# Altium PCB AVP32F2812_EVM_V1.0.PcbDoc (part 2 of 3)
Units mil, origin at the board's own origin, x right, y up, seen from the top; angles counter-clockwise.
Board outline 5669.29 x 3897.64 mil, 2 copper layers (Top Layer, Bottom Layer); 154 components, 189 nets, 732 pads, 469 vias.
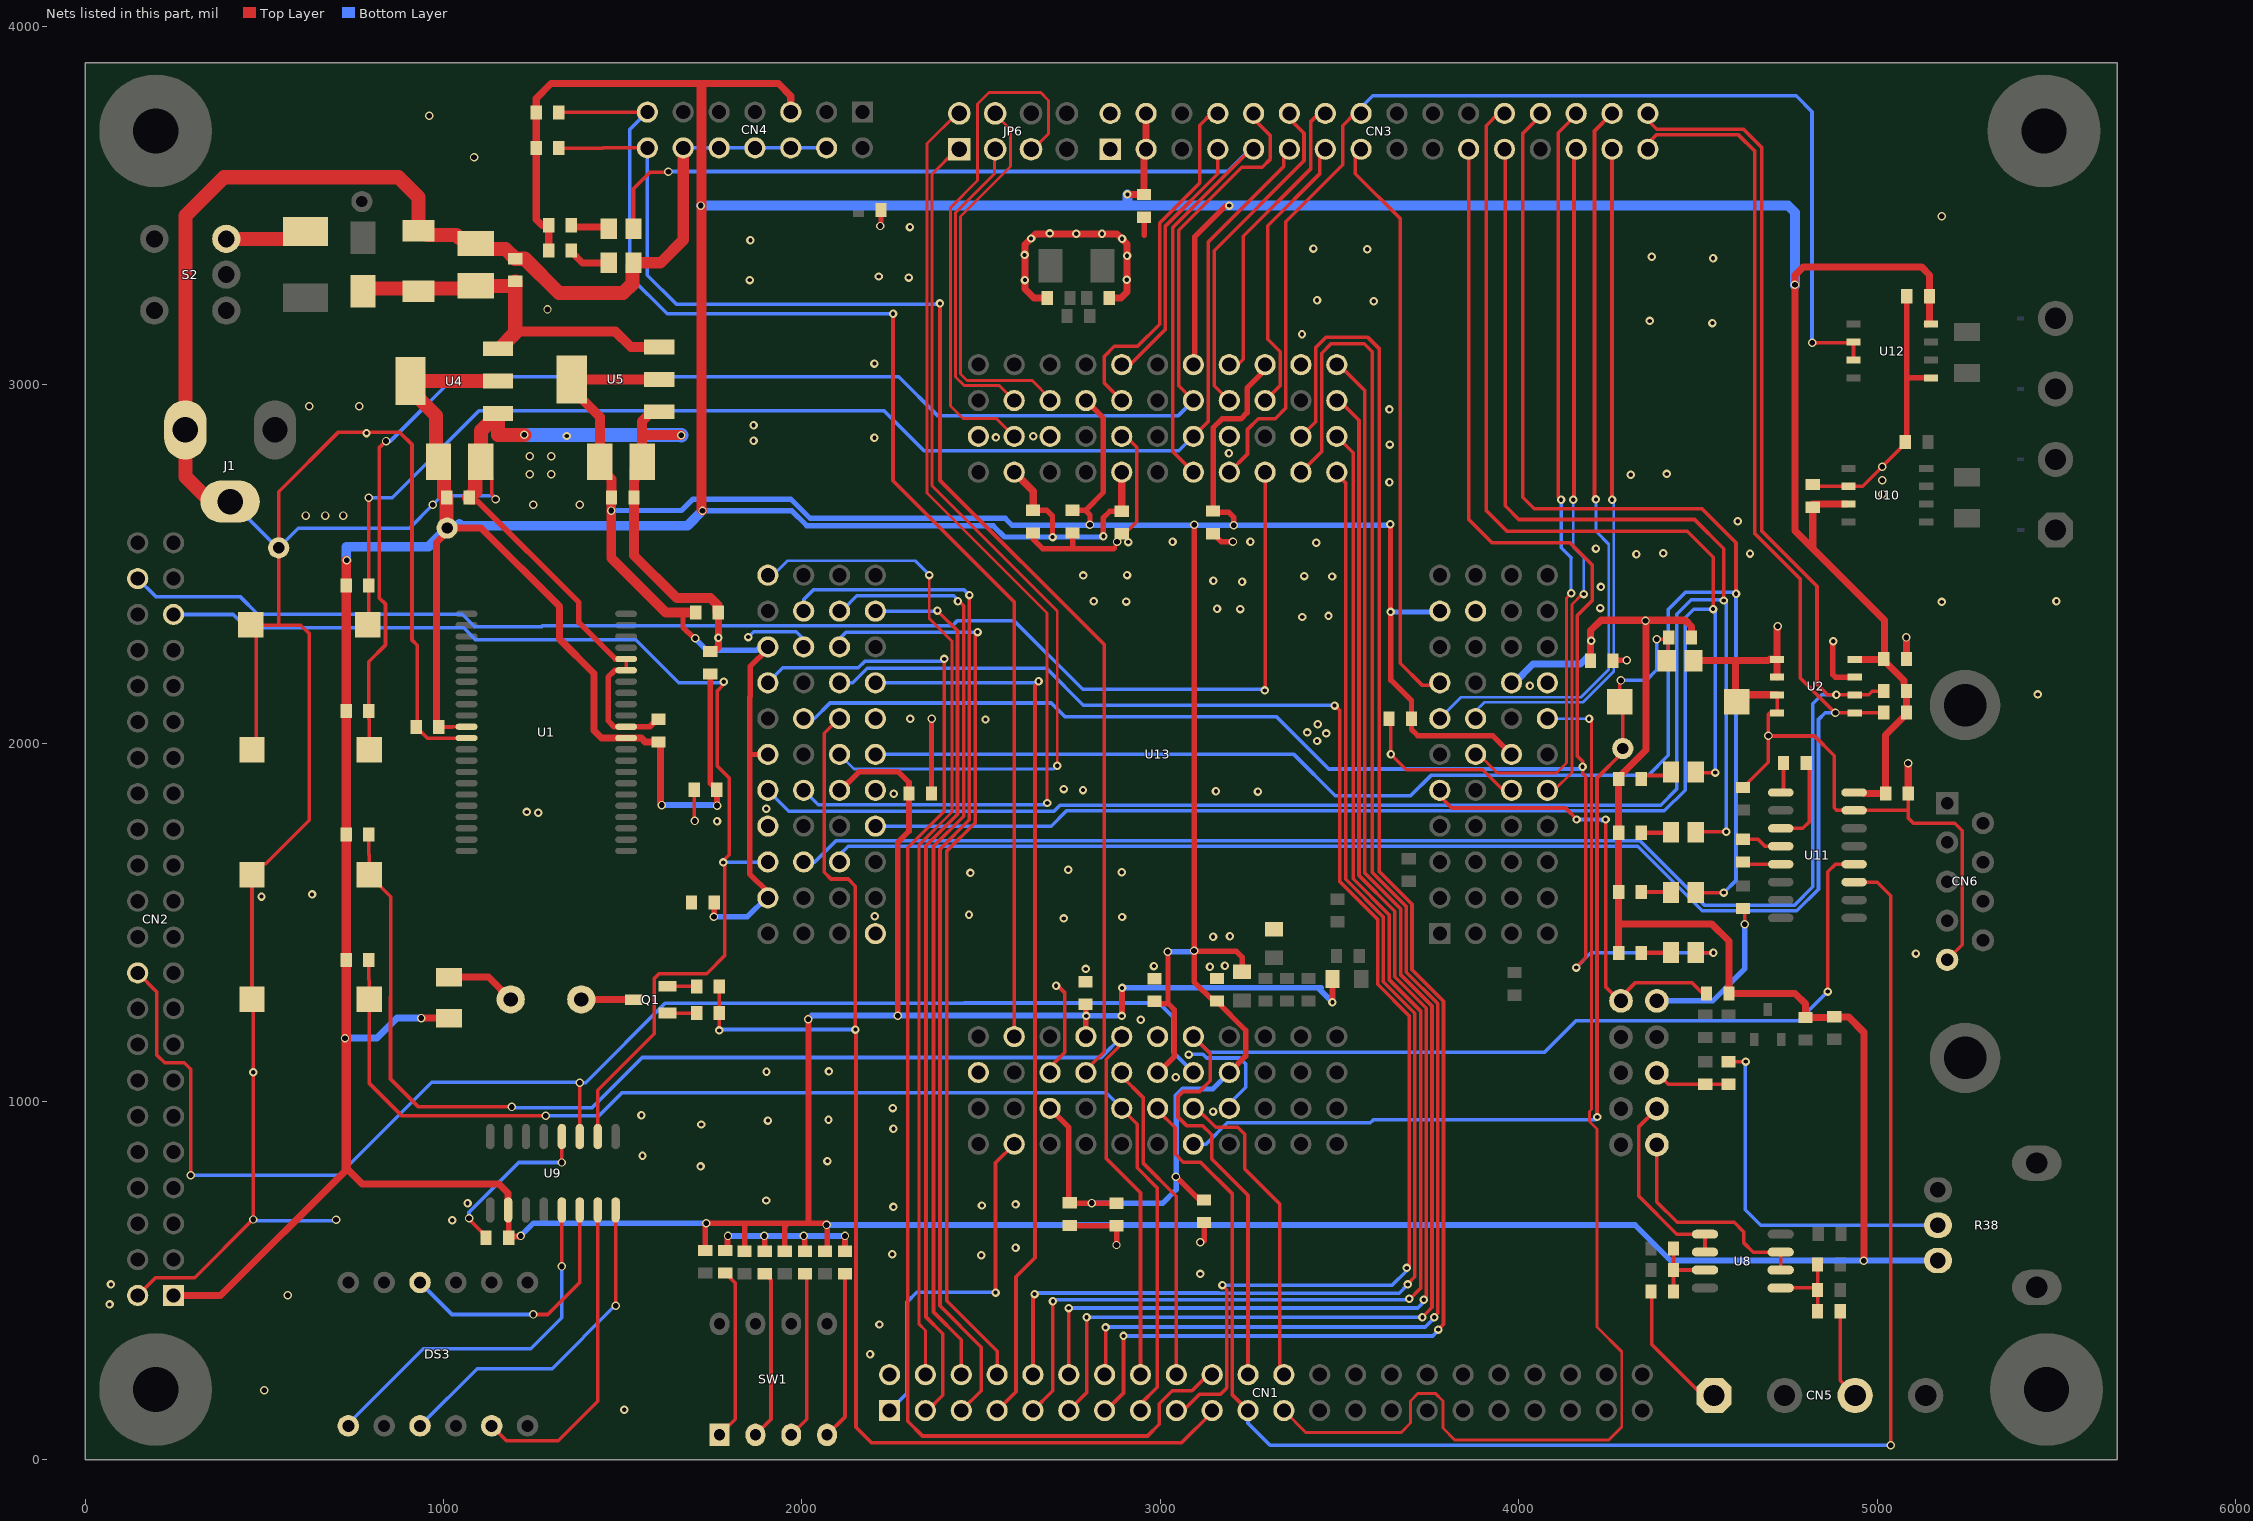
[diagram p2: the nets of this part, all layers, seen from the top]

## Via types
v1: diameter 23.62, hole 11.81, Top Layer to Bottom Layer, tented both sides, 308 vias
v2: diameter 23.62, hole 15.75, Top Layer to Bottom Layer, 161 vias

## Nets (pads, with @x,y where several pads share a name; then routed paths per layer and width w, separated by ;. In a path a pad name is that pad's centre, name@x,y a point inside that pad or via, vN(x,y) a via of type N, cw(c..) or ccw(c..) an arc to the next point about the centre after c; other vN are vias at no path point) (continued)
DGND: C1.2 C2.2 C3.2 C4.2 C5.1 C6.2 C7.2 C8.2 C9.2 C10.2 C11.2 C12.2 C13.2 C14.2 C15.2 C16.2 C17.2 C18.2 C19.2 C20.2 C21.2 C22.2 C23.2 C24.2 C25.2 C26.2 C31.2 C32.2 C33.2 C34.2 C47.2 C49.2 C50.2 C51.2 C52.2 C55.2 CN1.2 CN2.2 CN3.1 CN3.2 CN4.4 CN4.6 CN4.8 CN4.10 CN4.12 CN6.5 D2.1 DS2.2 J1.2 J1.3 JP5.2 K1.2 K2.2 K3.2 K4.2 L5.1 Q1.S R3.1 R5.1 R7.1 R9.1 R12.1 R28.2 R40.1 S1.2 TP6.1 U1.12 U1.34 U1.39 U1.40 U2.1 U2.2 U2.3 U2.4 U2.7 U4.1 U5.1 U9.4 U10.2 U11.15 U12.5 U13.19 U13.32 U13.38 U13.52 U13.58 U13.70 U13.78 U13.86 U13.99 U13.105 U13.113 U13.120 U13.129 U13.134 U13.142 U13.153 U13.163 | length 19772.3
  Top Layer w10: CN2.2@146.61,459.05 196.39,508.83 305.83,508.83 468,671 v2(469,671) v1(469,1082) 469,1281.41 K4.2@465.41,1285 K3.2@465.41,1633.12 495.84,1663.55 503.55,1663.55 625.26,1785.26 625.26,2306.02 601.92,2329.35 537,2329.35 ; K2.2@465.41,1981.24 477.76,1993.59 477.76,2313.86 465.41,2326.21 465.41,2329.35 537,2329.35 ; D2.1@930,3429.25 D2.1@930,3440 ; U1.12@1064.08,2014.25 954.25,2014.25 C1.2@923.5,2045 927,2048.5 927,2273 912,2288 912,2833 878.07,2866.93 705.54,2866.93 540,2701.38 TP6.1@540,2545 540,2332.36 537,2329.35 ; v2@1072.44,670 1118.5,623.94 C47.2@1118.5,620 ; C8.2@1088.31,2769.25 1104.05,2769.25 1134.49,2738.82 1134.49,2694.2 1145,2683.69 v2(1145,2680) ; v2@1330,835 U9.4@1330,902.36 ; U1.34@1509.4,2045.75 U1.34@1518.24,2045.75 ; U1.39@1509.4,2203.23 U1.40@1509.4,2234.72 ; Q1.S@1625.08,1321.57 R28.2@1706.42,1321.57 ; C11.2@1699.5,1870 1699.5,1784.5 v2(1701,1783) ; C11.2@1701.25,1868.25 C11.2@1702.99,1869.99 ; C11.2@1703.5,1870 1703.5,1871.22 C11.2@1705,1872.72 ; U13.99@2004.73,2268.5 U13.99@2011.5,2268.5 ; U13.142@2692.13,1081.1 2692.13,1096.13 2732.65,1136.65 2732.65,1304.35 v1@2710,1327 ; 2874,2542 2874,2558 2934,2618 2934,2826 2904.1,2855.9 U13.70@2892.13,2855.9 ; U13.163@3192.13,981.1 U13.163@3208.9,981.1 ; C21.2@3637.5,2068 3643,2062.51 v1(3643,1969) 3686,1926 3899,1926 3956.5,1868.5 U13.19@3979.53,1868.5 ; C52.2@4625,1538.5 4630,1533.51 v2(4630,1495) ; C51.2@4625,1876.5 4628.94,1876.5 4639.69,1887.24 4639.69,1891.18 4695.65,1947.14 v2@4695.65,2020 ; U2.3@4720.65,2135 4720.65,2085 4700.65,2085 4695.65,2080 v2@4695.65,2020 ; C55.2@4820,2721.5 4824.69,2716.8 4959.24,2716.8 5078.5,2836.06 R40.1@5078.5,2840 ; C34.2@5086.5,1860 5086.5,1811.05 ; CN6.5@5195,1395.42 5237.44,1437.87 5237.44,1755.83 5216.44,1776.83 5100.94,1776.83 5086.5,1791.27 5086.5,1811.05 ; v2@4695.65,2020 4825,2020 4880,1965 4880,1820 4887.72,1812.28 U11.15@4935.51,1812.28 5085.26,1812.28 5086.5,1811.05
  Top Layer w15: v2@2220.5,3441.5 R12.1@2220.5,3487 ; C14.2@2361.5,1860 v2@2361.5,2068 ; C15.2@2645,2586.5 2645,2569 2672,2542 2762,2542 ; C24.2@2747,654.5 2748,653.5 C32.2@2878,653.5 v2@2878,598 ; C22.2@2755,2586.5 2755,2549 2762,2542 ; 2870.44,2542 2762,2542 ; C3.2@2944,3468 2955,3457 2955,3417 ; v2@3122,612 C19.2@3122,662.5 ; C31.2@3147,2584.5 3169.51,2562 v2@3206,2562 ; C13.2@4262.81,2230 4263.81,2231 v2(4301,2231) ; v1@4876,2286 4876,2191 4883,2184 U2.7@4937.27,2184 ; R40.1@5078.5,2840 5082.5,2844 5082.5,3013 ; C49.2@5082.5,3247 5082.5,3013 ; U12.5@5150.27,3019 5088.5,3019 5082.5,3013
  Top Layer w15.75: C7.2@1071.5,2685 1071.5,2681.06 1079.37,2673.19 1096.81,2673.19 1377.5,2392.5 1377.5,2336.5 1479.28,2234.72 U1.40@1509.4,2234.72 ; U1.34@1509.4,2045.75 1476,2045.75 1459,2062.75 1459,2184.14 1478.1,2203.23 U1.39@1509.4,2203.23 ; U1.34@1518.24,2045.75 1575.32,2045.75 1596.06,2066.5 C2.2@1600,2066.5 ; R3.1@1786,584.5 1792.06,590.55 1792.06,619.93 v2@1793.56,621.44 ; v2(1895,625) 1896,624 R5.1@1896,582.5 ; v2(2005,625) 2008,622 R7.1@2008,582.5 ; R9.1@2120,582.5 v2(2120,625)
  Top Layer w19.68: C16.2@1753.94,2256.5 1766.5,2269.05 C20.2@1766.5,2365 ; C5.1@2684.5,3242 2647,3242 2622,3267 v1(2622,3292) 2622,3391 v1(2639,3408) 2652,3421 v1(2765,3421) v1(2837,3421) 2879,3421 v1(2893,3407) 2907,3393 v1(2907,3360) 2907,3259 2890,3242 C4.2@2857.5,3242 ; C6.2@4487.4,2230 4605,2230 ; U2.3@4720.65,2135 4628.38,2135 S1.2@4608.38,2115 4605,2118.39 4605,2230 ; U2.2@4720.65,2185 U2.1@4720.65,2235 ; v2@4722,2318 v2(4722,2326) 4720.65,2324.65 U2.1@4720.65,2235 ; 4605,2230 4695.65,2230 4700.65,2235 U2.1@4720.65,2235
  Top Layer w20: C50.2@5081.5,2235 v2@5081.5,2295.5 ; C34.2@5086.5,1860 v2@5086.5,1944.5
  Top Layer w27.56: U5.1@1602.05,2924.45 1580.39,2924.45 1554.05,2898.11 1554.05,2860 ; v2(1663,2859) 1662,2860 1554.05,2860 ; C20.2@1764.53,2366.97 1764.53,2385.47 1745,2405 1650.46,2405 1531.5,2523.96 C25.2@1531.5,2685 1531.5,2731.46 1532.4,2732.36 1532.4,2763.35 C26.2@1554.05,2785 1554.05,2860
  Top Layer w31.5: DS2.2@1530,3340 1605,3340 1668.66,3403.66 CN4.12@1668.66,3660.79
  Top Layer w39.37: J1.2@404.58,2674.02 348.98,2674.02 279.58,2743.42 J1.3@279.58,2874.02 279.58,3471.58 387,3579 874,3579 930,3523 D2.1@930,3440 ; D2.1@955.59,3418.23 1035.44,3418.23 1043.87,3409.8 1074.25,3409.8 C9.2@1090,3394.05 1105.75,3378.31 1173.19,3378.31 C10.2@1200,3351.5 1226.5,3351.5 1322,3256 1501,3256 1526.85,3281.85 1526.85,3330.75 1530,3333.9 DS2.2@1530,3340 ; C7.2@1071.5,2685 1088.31,2701.81 1088.31,2769.25 C8.2@1104.05,2785 1104.05,2871.46 U4.1@1152.05,2919.45 1152.05,2860 v2(1225,2860)
  Bottom Layer w10: J1.2@404.58,2674.02 407.44,2674.02 536.46,2545 TP6.1@540,2545 595,2600 905,2600 v2(970,2665) 995,2690 v2@1140,2690 ; v2(469,671) 472,668 698,668 v2(700,670) ; v2(1071,674) 1071,691 1210,830 v2(1330,830) ; CN4.12@1668.66,3660.79 CN4.10@1768.66,3660.79 CN4.8@1868.66,3660.79 CN4.6@1968.66,3660.79 CN4.4@2068.66,3660.79 ; v1(1850,2296) 1865,2311 1984,2311 2004.73,2290.27 U13.99@2004.73,2268.5 ; v1@3090,1132 3118.6,1132 3128.97,1121.63 3221.37,1121.63 3238,1105 3238,1040 3192.13,994.13 U13.163@3192.13,981.1
  Bottom Layer w15: JP5.2@4385,1281 4541,1281 4630,1370 v2(4630,1495)
  Bottom Layer w15.75: v2(1793.56,625) v2(1895,625) v2(2005,625) v2(2120,625)
  Bottom Layer w39.37: v2(1225,2860) 1662,2860 v2(1663,2859)
  other v1: 1504,140 2190,295 2216,378 68,434 72,490 3111,519 2500,571 2252,574 2596,592 1024,669 2255,706 2502,710 2596,713 1067,716 1900,724 1717,819 2071,834 1555,849 2255,924 1719,936 1905,947 2074,949 1552,962 3147,972 2253,982 3043,1068 1901,1083 2075,1084 3079,1131 2945,1228 2709,1323 2792,1370 3138,1376 2982,1378 3180,1379 5108,1413 3147,1460 3194,1461 2730,1511 2893,1515 2203,1517 2466,1521 492,1572 633,1578 2470,1638 2892,1640 2743,1647 1763,1782 1264,1806 1232,1808 1900,1817 2256,1859 3272,1865 3155,1866 2784,1869 2730,1872 3437,2006 3463,2027 3410,2030 3439,2053 2512,2066 2302,2068 5448,2136 4031,2160 4877,2284 1767,2294 3396,2352 3469,2355 3223,2374 3158,2375 4227,2377 5180,2394 2905,2395 2814,2396 5500,2396 4229,2436 3228,2450 3148,2453 3479,2465 3401,2466 2785,2468 2907,2469 4328,2527 4645,2529 4403,2530 4215,2543 3435,2559 2910,2561 3034,2562 3251,2562 4611,2619 3639,2728 4312,2749 4413,2751 3191,2809 3640,2833 1865,2844 2202,2852 2541,2853 2645,2856 1344,2857 785,2865 1865,2887 3639,2931 2202,3059 3395,3141 4540,3172 4365,3178 3595,3233 3437,3236 1854,3292 2906,3293 2298,3299 2214,3302 4542,3353 4371,3357 2621,3362 3577,3378 3427,3380 1856,3403 2691,3422 2301,3440
  other v2: 500,195 565,460 2877.44,599.83 3111,608 5085.94,1943.83 4696.44,2020.83 2362,2068 5080.94,2294.83 2879,2562 3202.44,2561.83 615,2635 670,2635 720,2635 1250,2665 1380,2665 5013.48,2695 5013.48,2733.02 1240,2750 1300,2750 5013.48,2771.04 1240,2800 1300,2800 625,2940 765,2940 1290,3210 2218.44,3442.83 5180,3470 1085,3635 960,3750
DP: DS3.dp U9.16 | length 952
  Top Layer w10: v2(1480,430) U9.16@1480,697.64
  Bottom Layer w10: DS3.dp@934.25,95.27 1093.98,255 1303,255 1478,430 v2(1480,430)
DSP_R\S\T\: C6.1 R15.2 S1.1 TP3.1 U13.160 | length 2699.2
  Top Layer w10: v1(4219,957) 4215,957 4218,960 4218,1903 4290,1975 TP3.1@4290,1985 4290,2106.61 S1.1@4281.61,2115 v2@4281.61,2166.87 ; v2@4390,2290 R15.2@4413.5,2290 ; C6.1@4412.6,2230 4417,2234.4 4417,2286.5 R15.2@4413.5,2290 ; R15.2@4418.5,2295 R15.2@4413.5,2290
  Bottom Layer w10: U13.160@3092.13,881.1 3127.1,881.1 3186.58,940.58 3585.58,940.58 3593.81,948.81 4212.81,948.81 4219,955 v1(4219,957) ; v2(4285,2175) 4355,2175 4385,2205 v2(4385,2290)
DVDD1V8: C17.1 C18.1 C19.1 C20.1 C21.1 C22.1 C23.1 C24.1 C25.1 C26.1 C31.1 C32.1 L4.1 U5.2 U13.23 U13.37 U13.56 U13.75 U13.100 U13.112 U13.128 U13.143 U13.154 U13.162 | length 10201.5
  Top Layer w15: 1668,2365 1668,2323 1698.17,2292.83 v2(1702.44,2292.83) ; v2@1755,1516 C17.1@1755,1555 ; U13.128@1904.73,1568.5 1904.73,1584.27 1854,1635 1854,1966 ; U13.112@1904.73,1968.5 1856.5,1968.5 1854,1966 ; U13.100@1904.73,2268.5 1904.73,2262.73 1855.31,2213.31 1855.31,2130.15 1854,2128.84 1854,1966 ; U13.143@2692.13,981.1 2744,929.23 2744,720.5 C24.1@2747,717.5 2747.67,716.83 v2(2808.44,716.83) 2877.67,716.83 C32.1@2878,716.5 ; C22.1@2755,2649.5 2790.5,2649.5 ; U13.75@2792.13,2955.9 2841,2907.03 2841,2700 2790.5,2649.5 ; v2(2803.44,2609.83) 2803.44,2636.55 2790.5,2649.5 ; U13.154@2992.13,1081.1 2989,1084.23 2997.23,1084.23 3039,1126 3039,1256 3022,1273 3019,1273 ; C23.1@2995.5,1279.5 C23.1@2984,1279.5 2990.5,1273 3019,1273 ; v2@3021,1417.83 3021,1275 3019,1273 ; v2@3045,790 3109.5,725.5 C19.1@3122,725.5 ; v2(3094.44,2609.83) v2@3094.44,1419 ; C31.1@3144.95,2643.84 C31.1@3147,2643.84 ; C31.1@3147,2643 C31.1@3147,2643.84 ; U13.162@3192.13,1081.1 3238,1126.98 3238,1199 3158,1279 C18.1@3158,1280.5 3147.5,1280.5 3094,1334 3094,1419 v2@3094.44,1419 ; v2(3205,2608) 3205,2630 3191.16,2643.84 C31.1@3147,2643.84 ; L4.1@3228,1362 3228,1403 3212,1419 v2@3094.44,1419 ; U13.56@3292.13,3055.9 3292.13,3041.13 3242,2991 3242,2922 3225,2905 3172,2905 3147,2880 C31.1@3147,2643.84 ; v1(3641,2611) 3642,2610 v1(3642,2366) 3646,2366 3643,2363 3643,2176 3700.5,2118.5 C21.1@3700.5,2068 3700.5,2038.5 3718,2021 3927.03,2021 U13.23@3979.53,1968.5 ; U13.37@3779.53,2368.5 U13.37@3786.5,2368.5
  Top Layer w27.56: U5.2@1357.95,3015 1357.95,2988.05 1435.94,2910.06 C26.1@1435.94,2785 1435.94,2769.25 1468.5,2736.69 C25.1@1468.5,2685 1470,2683.51 1468,2681.51 v2(1468,2649) 1468,2517 1620,2365 1668,2365 C20.1@1703.5,2365 ; U5.2@1367.95,3015 U5.2@1602.05,3015
  Bottom Layer w15: v2(1468,2649) 1664,2649 1696,2681 1968.7,2681 2022.2,2627.5 2567,2627.5 2586.5,2608 v2@3199,2608 ; v2@1702,2292 1735,2259 1872.72,2259 1882.22,2268.5 U13.100@1904.73,2268.5 ; v2(1754.44,1515.83) 1847.66,1515.83 1900.34,1568.5 U13.128@1904.73,1568.5 ; U13.143@2692.13,981.1 U13.143@2701.9,981.1 ; v2@2809,715 2810,716 3006,716 3044,754 3044,1016.1 3062.9,1035 3146.02,1035 U13.162@3192.13,1081.1 ; U13.154@2992.13,1072.87 U13.154@2992.13,1081.1 ; v2(3020.44,1417.83) 3090.89,1417.83 v2(3093.89,1420.83) ; v2(3205,2608) 3642.17,2608 v1@3643,2608.83 ; v1(3642,2366) 3777.02,2366 U13.37@3779.53,2368.5
  other v2: 3043.44,789.83
DVDD3V3: C1.1 C2.1 C3.1 C7.1 C8.1 C11.1 C12.1 C13.1 C14.1 C15.1 C16.1 C33.1 C34.1 C41.2 C47.1 C49.1 C50.1 C55.1 CN2.1 CN3.3 CN3.4 CN4.5 L3.1 R1.2 R2.2 R4.2 R6.2 R8.2 R10.2 R13.1 R14.1 R15.1 R16.1 R17.1 R21.2 R22.1 R23.1 R24.2 R25.2 R27.2 R29.1 R32.1 R35.1 R37.1 R38.3 R50.1 TP4.1 U1.11 U1.33 U2.8 U4.2 U9.10 U10.3 U11.16 U12.8 U13.31 U13.64 U13.69 U13.81 U13.114 U13.145 | length 28763.1
  Top Layer w10: C1.1@986.5,2045 1024.44,2045 1025.19,2045.75 U1.11@1064.08,2045.75 ; R15.1@4475,2301.5 R15.1@4481.5,2295
  Top Layer w15: C15.1@2645,2649.5 2683.5,2649.5 2699,2634 v1(2699,2575) ; U13.145@2792.13,1181.1 C12.1@2792.13,1267.38 ; v1(2841,2577) 2841,2629 2859,2647 C33.1@2892,2647 ; U13.64@3092.13,3055.9 3096,3059.78 3096,3413 3183,3500 v1(3192,3500)
  Top Layer w15.75: U9.10@1180,697.64 1181.5,696.14 C47.1@1181.5,620 1184.99,623.49 1213.49,623.49 v2(1215,625) ; R4.2@1730,584.5 1730,658 v2(1733,661) 1961,661 ; C16.1@1744,2193.01 1744,1888.5 C11.1@1762.5,1870 ; C16.1@1750,2193.5 C16.1@1753.94,2193.5 ; v2(1763,1826) 1763,1862.5 1761,1864.5 1766.5,1870 C11.1@1764.5,1872 ; R6.2@1840,582.5 1840,658 ; R8.2@1952,582.5 1952,652 1961,661 ; v2@2018,1235 2018,661 ; 2070,600 2070,661 2018,661 ; U13.114@2104.73,1868.5 2107.5,1868.5 2159,1920 2269,1920 2298.5,1890.5 C14.1@2298.5,1860 2298.5,1754.5 2267,1723 v2(2267,1239) v2@2267,1236 ; v1(2892,1239) 2893,1240 v1(2893,1317) ; v1(3480,1277) L3.1@3480,1342 ; 4770,2922 4773,2919 ; 1961,661 2018,661
  Top Layer w19.68: CN2.1@246.61,459.05 378.06,459.05 728.5,809.5 ; 728.5,814.5 773.01,770 ; v2(938,1233) 938,1231.93 938.98,1232.91 R23.1@1015,1232.91 ; C1.1@986.5,2045 980.59,2050.91 980.59,2065.78 980,2066.37 980,2559.35 1010,2589.35 TP4.1@1010,2600 1104.89,2600 1324,2380.89 1324,2290 1420,2194 1420,2035 1440.75,2014.25 U1.33@1509.4,2014.25 1552,2014.25 1562.75,2003.5 C2.1@1600,2003.5 1605,1998.5 1605,1832.08 1608.73,1828.35 v2(1608.73,1827.28) ; R17.1@1293.5,3375 R16.1@1293.5,3445 1275,3445 1258.5,3461.5 R14.1@1258.5,3660 R13.1@1258.5,3760 1258.5,3798.5 1300,3840 1934,3840 1968.66,3805.34 CN4.5@1968.66,3760.79 ; v1(2908,3531) 2908.5,3530.5 C3.1@2954,3530.5 ; C3.1@2944,3530.99 2954,3540.99 2954,3651 CN3.3@2960,3657 2960,3740 CN3.4@2961,3741 ; U13.31@3979.53,2168.5 U13.31@3979.53,2177.53 ; C13.1@4199.82,2230 v1@4199.82,2284 ; v1@4200,2286.38 4200,2314 4228.83,2342.83 v2@4350,2342.83 ; R27.2@4278.5,1415 4278.5,1496 ; R15.1@4481.5,2295 4481.5,2325.5 4464.17,2342.83 v2@4350,2342.83 ; v2@4770,3280 4770,2922 4770,2593 4820,2543 ; v2(4770.44,3278.83) 4770.44,3305.44 4794,3329 5123,3329 5145.5,3306.5 C49.1@5145.5,3247 5145.5,3176.77 5138.5,3169.77 U12.8@5139.27,3169 ; U10.3@4915.98,2666.8 4820,2666.8 4820,2543 ; U11.16@4935.51,1862.28 4960.2,1862.28 4962.48,1860 C34.1@5023.5,1860 5023.5,2023.07 5081.5,2081.06 R2.2@5081.5,2085 R1.2@5081.5,2145 ; U2.8@4937.27,2234 5017.5,2234 C50.1@5018.5,2235 ; v2(4962.44,555.83) 4962.44,1193.56 4919.5,1236.5 C41.2@4880,1236.5 4878,1234.5 R22.1@4800,1234.5 4800,1273 4771,1302 4586,1302 4586,1448 4538,1496 4278.5,1496 ; 5075,2165 5075,2174.57 5018.5,2231.06 C50.1@5018.5,2235 ; 4278.5,1496 R25.2@4278.5,1585 R24.2@4278.5,1750 4278.5,1903.94 4355,1980.43 4355,2337.83 v2@4350,2342.83 ; 4820,2543 5020,2343 5020,2236.5 C50.1@5018.5,2235
  Top Layer w20: 773.01,770 1155,770 1180,745 U9.10@1180,697.64 ; U13.81@2592.13,2755.9 2645,2703.03 C15.1@2645,2649.5 ; C33.1@2892,2647 2892,2755.78 U13.69@2892.13,2755.9
  Top Layer w27.56: 728.5,814.5 R37.1@728.5,1395 R35.1@728.5,1745 R32.1@728.5,2090 R29.1@728.5,2440 v2@728.5,2510 ; 1719.35,3834.65 1719.35,2651.92 v2(1722.44,2648.83) ; CN3.4@2944,3758 CN3.4@2961,3741
  Top Layer w39.37: TP4.1@1010,2600 1008.5,2601.5 C7.1@1008.5,2685 1001.69,2691.81 1001.69,2769.25 C8.1@985.94,2785 978.7,2792.25 978.7,2914.65 907.95,2985.39 U4.2@907.95,3010 U4.2@1152.05,3010
  Bottom Layer w15: v2(1722.44,2648.83) 1971.17,2648.83 2013.5,2606.5 2533.5,2606.5 2565,2575 v1(2699,2575) v1@2842,2575
  Bottom Layer w15.75: v2(1215,625) 1251,661 v2(1733,661) ; v2(1608.73,1827.28) 1761.72,1827.28 v2(1763,1826) ; v2(2017.44,1229.83) 2027.62,1240 v1@2795,1240 ; v2(2068.44,655.83) 4324.17,655.83 4423.43,556.57 R38.3@5169.41,556.57 ; v1(2793,1239) v1(2892,1239) ; v1@2897,1318 3439,1318 ; 3449,1318 3439,1318 ; v1(3480,1277) 3439,1318
  Bottom Layer w19.68: v2(725,1176.77) 725.75,1177.53 814.53,1177.53 870,1233 v2(938,1233) ; U13.31@3979.53,2168.5 3987.5,2168.5 4040,2221 4172,2221 4200,2249 v1@4200,2286
  Bottom Layer w27.56: v2(730,2510) 728.5,2511.5 728.5,2547.83 957.83,2547.83 TP4.1@1010,2600 1016.03,2606.03 1038.86,2606.03 1043.92,2611.08 1048.46,2606.54 1680.15,2606.54 v2(1722.44,2648.83) ; v2(1718,3500) 2909,3500 ; v1(2908,3531) 2908,3501 2909,3500 ; v2@4770,3276 4770,3481 4751,3500 v1(3192,3500) 2909,3500
  other v1: 4202,2286
  other v2: 4353.44,2341.83
E: DS3.e U9.13 | length 1024.9
  Top Layer w10: v2(1330,540) U9.13@1330,697.64
  Bottom Layer w10: DS3.e@734.25,95.27 737.1,98.12 737.1,104.1 943,310 1243,310 1330,397 v2(1330,540)
EMU0: CN4.13 R13.2 U13.137 | length 3663.1
  Top Layer w10: R13.2@1321.5,3760 1444.44,3760 1445.23,3760.79 CN4.13@1568.66,3760.79 ; v1(2254,3197.72) 2254,2732 2592.13,2393.87 U13.137@2592.13,1181.1
  Bottom Layer w10: CN4.13@1568.66,3760.79 1519,3711.13 1519,3303 1624.28,3197.72 v1(2254,3197.72) v1@2256,3197.72
EMU1: CN4.14 R14.2 U13.146 | length 3812
  Top Layer w10: R14.2@1321.5,3660 1444.44,3660 1445.23,3660.79 CN4.14@1568.66,3660.79 ; v1(2385,3227) 2385,2733 2843,2275 2843,1138.63 2792.13,1087.75 U13.146@2792.13,1081.1
  Bottom Layer w10: CN4.14@1568.66,3660.79 1568.66,3305.34 1649,3225 2375,3225 v1@2384,3234
EPWM1A: CN1.4 U13.92 | length 2787.7
  Top Layer w8: CN1.4@2344.44,238 2344.44,361.56 2326,380 2326,1715 2418.81,1807.81 2418.81,2284.19 2355,2348 v1(2355,2469) v1@2355,2470
  Bottom Layer w8: U13.92@1904.73,2468.5 1919.5,2468.5 1960,2509 2316,2509 v1@2355,2470
EPWM1B: CN1.3 U13.93 | length 2514.2
  Top Layer w10: CN1.3@2344.44,138 2350,138 2393,181 2393,352 2346,399 2346,1713.79 2433.81,1801.6 2433.81,2313.19 2383,2364 2380,2364 v1@2384,2368
  Bottom Layer w10: U13.93@2204.73,2368.5 v1@2384,2368.5
  other v1: 2378,2370
EPWM2A: CN1.6 U13.94 | length 2591.6
  Top Layer w10: v1@2437,2397 2451,2383 2451,1796.16 2367,1712.16 2367,413 2444.44,335.56 CN1.6@2444.44,238
  Bottom Layer w10: U13.94@2104.73,2368.5 2110.5,2368.5 2153,2411 2423,2411 v1@2440,2394
  other v1: 2435,2396
EPWM2B: CN1.5 U13.95 | length 2891.7
  Top Layer w10: CN1.5@2444.44,138 2500,193.56 2500,315 2385,430 2385,1704 2467,1786 v1(2467,2413)
  Bottom Layer w10: U13.95@2004.73,2368.5 2004.73,2400.73 2032,2428 2087.92,2428 ; 2087.94,2427.98 2121.51,2427.98 ; 2121.54,2428 2187.92,2428 ; 2187.94,2427.98 2221.51,2427.98 ; 2221.54,2428 2452,2428 v1(2467,2413)
EPWM3A: CN1.8 U13.98 | length 2582.3
  Top Layer w10: v1@2490,2309 v1(2490,2310) 2483,2303 2483,1778 2404,1699 2404,444 2544.44,303.56 CN1.8@2544.44,238
  Bottom Layer w10: U13.98@2104.73,2268.5 2104.73,2290.73 2123.03,2309.03 2489.03,2309.03 v1(2490,2310)
EPWM3B: CN1.7 U13.101 | length 2539.1
  Top Layer w10: CN1.7@2544.44,138 2597,190.56 2597,511 2650,564 2650,2160 2660,2170 v1(2660,2173)
  Bottom Layer w10: U13.101@2204.73,2168.5 v1@2661,2168.5
EPWM4A: CN1.10 U13.45 | length 3632.1
  Top Layer w10: CN1.10@2644.44,238 v1@2644.44,455 ; U13.45@3492.13,2755.9 3492.13,2750.87 3517.13,2725.87 3517.13,1619.87 3622,1515 3622,1334 3709.81,1246.19 3709.81,510.81 3690,491 v1(3690,490)
  Bottom Layer w10: v1(2649,463) 2651.81,465.81 3162.93,465.81 3163.55,465.19 3666.19,465.19 v1@3689,488
EPWM4B: CN1.9 U13.46 | length 3849.4
  Top Layer w10: CN1.9@2644.44,138 2700,193.56 v1(2700,443) v1@2695,438 ; U13.46@3492.13,2855.9 3538,2810.03 3538,1621.63 3638,1521.63 3638,1340.63 3725.81,1252.82 3725.81,478.81 v1@3694,447
  Bottom Layer w10: v1(2700,443) 2703.81,446.81 v1@3693.81,446.81
  other v1: 3694,450
EPWM5A: CN1.12 U13.47 | length 3810.3
  Top Layer w10: CN1.12@2744.44,238 v1@2744.44,425 ; U13.47@3492.13,2955.9 3499.1,2955.9 3554,2901 3554,1631 3654,1531 3654,1348 3741.81,1260.19 3741.81,453.81 v1(3735,447)
  Bottom Layer w10: v1(2744,424) 3718,424 3735,441 v1(3735,447)
EPWM5B: CN1.11 U13.48 | length 4001.6
  Top Layer w10: CN1.11@2744.44,138 2794,187.56 v1(2794,398) v1@2794,399 ; U13.48@3492.13,3055.9 3498.22,3055.9 3570,2984.13 3570,1637.63 3670,1537.63 3670,1354.63 3757.81,1266.82 3757.81,426.07 3744.19,412.45 3744.19,412.19 v1@3730,398
  Bottom Layer w10: v1(2794,398) v1(3731,398)
EPWM6A: CN1.14 U13.49 | length 4357.2
  Top Layer w10: CN1.14@2844.44,238 2847,240.56 v1(2847,370) ; U13.49@3392.13,2755.9 3450,2813.78 3450,3088 3476,3114 3569,3114 3591,3092 3591,1639.25 3686,1544.25 3686,1361.25 3773.81,1273.44 3773.81,409.81 3764,400 v1(3764,398)
  Bottom Layer w10: v1@2847,371 3739,371 3764,396 v1(3764,398) v1@3764,402
EPWM6B: CN1.13 U13.50 | length 4414.4
  Top Layer w10: CN1.13@2844.44,138 2848,138 2897,187 v1(2897,346) ; U13.50@3409.1,2855.9 U13.50@3392.13,2855.9 3433,2896.78 3433,3104 3461,3132 3579,3132 3610,3101 3610,1642.88 3702,1550.88 3702,1367.88 3789.91,1279.97 3789.91,378.91 v1(3775,364)
  Bottom Layer w10: v1(2897,346) 3760,346 v1@3773,359
F: DS3.f U9.14 | length 722.2
  Top Layer w10: v2(1250,406) 1291,406 1380,495 U9.14@1380,697.64
  Bottom Layer w10: DS3.f@934.25,495.27 1023.53,406 v2(1250,406)
F14: CN1.1 U13.140 | length 1017
  Top Layer w10: v1(2540,467) 2540,828.98 U13.140@2592.13,881.1
  Bottom Layer w10: CN1.1@2244.44,138 2293,186.56 2293,441 2320,468 v1@2540,468
G: DS3.g U9.15 | length 892
  Top Layer w10: DS3.g@1134.25,95.27 1175.53,54 1320,54 1430,164 U9.15@1430,697.64
GPIO12/TZ1N: CN1.16 K3.1 R35.2 U13.149 | length 3862.9
  Top Layer w10: R35.2@791.5,1745 791.5,1688.51 792.18,1687.83 K3.1@792.18,1633.12 792.18,1631.82 852.19,1571.81 852.19,1293.19 852,1293 852,1063 930,985 v2(1190,985) ; U13.149@2892.13,1181.1 2892.13,1161.13 2849,1118 2849,841 2944.44,745.56 CN1.16@2944.44,238
  Bottom Layer w10: v2(1190,985) 1191.81,983.19 1414.19,983.19 1554,1123 2834.02,1123 U13.149@2892.13,1181.1
GPIO13/TZ2N: CN1.15 K4.1 R37.2 U13.151 | length 3429.5
  Top Layer w10: R37.2@791.5,1395 791.5,1339.51 792.18,1338.83 K4.1@792.18,1285 792.18,1051.82 884,960 v2(1285,960) ; U13.151@2892.13,981.1 2892.13,979.87 2935,937 2935,815 2991,759 2991,203 2944.44,156.44 CN1.15@2944.44,138
  Bottom Layer w10: v2(1285,960) 1433,960 1497.58,1024.58 2848.65,1024.58 U13.151@2892.13,981.1
GPIO14/TZ3N: CN1.18 U13.150 | length 906.2
  Top Layer w10: U13.150@2892.13,1081.1 2892.13,1070.87 2951.6,1011.4 2951.6,828.4 3044.44,735.56 CN1.18@3044.44,238
GPIO15/TZ4N: CN1.17 U13.102 | length 4091.4
  Top Layer w10: CN1.17@3044.44,138 3064,138 3110,184 3168,184 3185,201 3185,475 3173,487 v1(3173,488) ; v1(3486,2105) 3500,2091 3500,1614 3606,1508 3606,1327.37 3693.81,1239.56 3693.81,542.81 v1(3687,536)
  Bottom Layer w10: U13.102@2104.73,2168.5 2141.5,2168.5 2182.03,2209.03 2681.97,2209.03 2785,2106 3486,2106 v1(3486,2105) v1@3486,2101 ; v1(3173,488) 3647,488 v1@3686,527
GPIO16: CN1.20 U13.104 | length 3664.3
  Top Layer w10: v1(2397,2235) 2397,1810 2295,1708 2295,108 2336,67 2964,67 2997,100 2997,157 3033,193 3088,193 3133,238 CN1.20@3144.44,238
  Bottom Layer w10: U13.104@1904.73,2168.5 1946.22,2210 2157,2210 2174.98,2227.98 2221.51,2227.98 ; 2221.54,2228 2395,2228 2399,2232 2397,2234 v1(2397,2235)
GPIO17: CN1.19 R26.2 R28.1 U13.106 | length 3636.1
  Top Layer w10: v1(1769.41,1198.59) R26.2@1769.41,1246.77 R28.1@1769.41,1321.57 ; U13.106@2121.5,2068.5 U13.106@2104.73,2068.5 2102.5,2068.5 2062,2028 2062,1640 2081,1621 2129,1621 2149,1601 v1(2149,1201) 2149,1195.59 2150.69,1193.91 2150.69,91.31 2194,48 3059,48 3144.44,133.44 CN1.19@3144.44,138
  Bottom Layer w10: v1(1769.41,1198.59) 1771.82,1201 v1(2149,1201) 2149,1200.18 v1@2147.41,1198.59
GPIO24: CN3.21 LD4.2 U13.107 | length 5323.1
  Top Layer w10: CN3.21@3844,3658 3860,3642 3860,2624 3925,2559 4143,2559 4205,2497 4205,2398 4163,2356 4163,1964 4178,1949 v1(4178,1934) 4178,1915 4187,1906 4187,1401 v1(4160,1374) ; LD4.2@4493.58,1409.53 LD4.2@4493.58,1415.63 4542.37,1415.63 v1(4543,1415)
  Bottom Layer w10: U13.107@2004.73,2068.5 2034.5,2068.5 2077.98,2111.98 2695.83,2111.98 2733.81,2074 3324,2074 3470.02,1927.98 3796.31,1927.98 ; 3796.34,1928 3862.72,1928 ; 3862.74,1927.98 3896.31,1927.98 ; 3896.34,1928 3962.72,1928 ; 3962.74,1927.98 3996.31,1927.98 ; 3996.34,1928 4062.72,1928 ; 4062.74,1927.98 v1@4178,1927.98 ; v1(4160,1374) 4201,1415 v1(4543,1415)
GPIO25: CN3.26 LD3.2 U13.109 | length 5735.5
  Top Layer w10: CN3.26@4060,3757 4060,3750 4011,3701 4011,2686 4043,2654 4511,2654 4606,2559 v1(4606,2417) ; LD3.2@4493.58,1583.61 4494.19,1583 v1(4572,1583) ; v1@4604.5,2415.5 v1@4607,2413
  Bottom Layer w10: U13.109@2204.73,1968.5 3372.5,1968.5 3488,1853 3698,1853 3755,1910 4361,1910 4417,1966 4417,2373 4464.81,2420.81 4600.19,2420.81 4604,2417 v1(4606,2417) 4606,1617 v1(4572,1583)
GPIO26: CN3.23 LD2.2 U13.116 | length 5776.6
  Top Layer w10: CN3.23@3944,3658 3962,3640 3962,2662 4000,2624 4490,2624 4572,2542 v1(4572,2398) ; LD2.2@4493.58,1751.59 4496,1754 4497,1753 v1(4579,1753)
  Bottom Layer w10: U13.116@1904.73,1862.27 U13.116@1904.73,1868.5 1963.04,1810.19 2703.19,1810.19 2720,1827 4396,1827 4441,1872 4441,2360 4481,2400 4570,2400 v1(4572,2398) 4579,2391 v1(4579,1753) v1@4573,1753
GPIO27: CN3.24 LD1.2 U13.117 | length 5341
  Top Layer w10: CN3.24@3944,3758 3909,3723 3909,2649 3967,2591 4470,2591 4542,2519 v1@4542,2376 ; LD1.2@4495,1920.98 LD1.2@4493.58,1919.57 4495.15,1918 v1@4544.13,1918 ; v1@4542.57,1919.57 v1@4544.13,1918 ; v1(4548,1918) v1@4544.13,1918
  Bottom Layer w10: U13.117@2204.73,1768.5 2695.5,1768.5 2738,1811 4406,1811 4464,1869 4464,2350 4488,2374 v1(4542,2374) 4548,2368 v1(4548,1918)
GPIO28/RXDA: CN1.22 U11.12 U13.157 | length 3407.8
  Top Layer w10: U13.157@3092.13,1181.1 3139,1134.23 3139,1058 3109,1028 3063,1028 3049,1014 3049,957 3073,933 3117,933 3143,907 3143,840 3244.44,738.56 CN1.22@3244.44,238 ; v1(4862,1307) 4862,1641 4883.28,1662.28 U11.12@4935.51,1662.28
  Bottom Layer w10: U13.157@3092.13,1181.1 3135.6,1137.63 4071.63,1137.63 4159,1225 4780,1225 v1(4862,1307)
GPIO29/TXDA: CN1.21 U11.11 U13.155 | length 4481.6
  Top Layer w10: U13.155@2992.13,981.1 2992.13,975.87 3041,927 3041,854 3064,831 3112,831 3201,742 3201,181.44 CN1.21@3244.44,138 ; U11.11@4935.51,1612.28 4999.72,1612.28 5038,1574 v2(5038,41)
  Bottom Layer w10: CN1.21@3244.44,138 3244.44,102.56 3306,41 v2(5038,41)
GPIO30/XA18: CN2.20 U9.3 U13.158 | length 3943.5
  Top Layer w10: CN2.20@146.61,1359.05 200,1305.67 200,1130 222,1108 276.44,1108 294.44,1090 v2(294.44,794.33) ; U9.3@1380,902.36 v2(1380,1052.83)
  Bottom Layer w10: v2(294.44,794.33) 707.33,794.33 966.81,1053.81 1379.01,1053.81 v2(1380,1052.83) 1396.83,1052.83 1618.02,1274.02 2451.64,1274.02 2452.63,1275 2996,1275 3035,1236 3035,1138.23 U13.158@3092.13,1081.1
GPIO32/SDAA: CN3.31 R2.1 U2.5 U13.122 | length 5534
  Top Layer w10: CN3.31@4344,3658 4383,3697 4613,3697 4658,3652 4658,2585 4785,2458 4785,2182 4882,2085 v2(4883.37,2085) R2.1@5018.5,2085
  Bottom Layer w10: U13.122@2104.73,1668.5 2104.73,1687.73 2128.98,1711.98 4331.4,1711.98 4511.37,1532 4775.63,1532 4836,1592.37 4836,2066 4855,2085 v2(4883.37,2085)
GPIO33/SCLA: CN3.32 R1.1 U2.6 U13.123 | length 5665.6
  Top Layer w10: U13.123@2004.73,1668.5 U13.123@2006.22,1670 ; CN3.32@4344,3758 4344,3754 4385,3713 4627,3713 4678,3662 4678,2592 4832,2438 4832,2164 4861,2135 v1(4886,2135) 4976.44,2135 4986.44,2145 R1.1@5018.5,2145
  Bottom Layer w10: U13.123@2004.73,1668.5 2035.5,1668.5 2094.98,1727.98 4338.02,1727.98 4518,1548 4769,1548 4820,1599 4820,2110 4845,2135 v1(4886,2135)
GPIO35: CN2.39 U9.2 U13.124 | length 3269.4
  Top Layer w10: U9.2@1430,902.36 1430,1031.38 1587.42,1188.81 1587.42,1343.41 1600.94,1356.93 1733.93,1356.93 1784,1407 1784,1663.19 v1(1780,1667.19) 1780,1672 1797,1689 1797,1903 1763,1937 1763,2145 1782,2164 v1(1782,2171)
  Bottom Layer w10: CN2.39@246.61,2359.05 413.22,2359.05 450.27,2322 1056,2322 1089.17,2288.83 1536.17,2288.83 1656.5,2168.5 v1@1788,2168.5 ; v1(1780,1667.19) 1903.41,1667.19 U13.124@1904.73,1668.5
GPIO36: CN2.42 U13.53 | length 3897.4
  Top Layer w10: v1@3292.13,2147 U13.53@3292.13,2755.9
  Bottom Layer w10: CN2.42@146.61,2459.05 196.67,2409 432.27,2409 481.27,2360 1052,2360 1087.06,2324.94 1273.63,2324.94 1275.69,2327 2419,2327 2434,2342 2591,2342 2783,2150 3288,2150 v1(3291,2147) ; v1@3286.5,2142.5 v1@3287,2142
GPIO48: CN3.13 U13.55 | length 793.6
  Top Layer w10: U13.55@3292.13,2955.9 3334,2997.78 3334,3092 3299.5,3126.5 3299.5,3443.5 3444,3588 CN3.13@3444,3658
GPIO49: CN3.16 U12.2 U12.3 U13.57 | length 3285.4
  Top Layer w10: U13.57@3192.13,2755.9 3243,2806.78 3243,2875 3273,2905 3320,2905 3350,2935 3350,3455 3509,3614 3509,3723 CN3.16@3544,3758 ; v2(4819,3117) U12.2@4921.73,3117 ; 4831,3116 4831.64,3115.36 ; U12.2@4930.73,3116 4933.73,3113 U12.3@4933.73,3069
  Bottom Layer w10: CN3.16@3544,3758 3592,3806 4774,3806 4818,3762 4818,3117 v2(4819,3117)
GPIO50: CN3.12 U13.59 | length 947.3
  Top Layer w10: U13.59@3192.13,2955.9 3191.1,2955.9 3150,2997 3150,3374 3400.53,3624.53 3400.53,3701.47 CN3.12@3344,3758
GPIO51: CN3.14 U13.60 | length 820.4
  Top Layer w10: U13.60@3192.13,3055.9 3215.9,3055.9 3231,3071 3231,3414 3419,3602 3419,3733 CN3.14@3444,3758
GPIO52: CN3.8 U13.71 | length 985.2
  Top Layer w10: U13.71@2892.13,2955.9 2843,3005.03 2843,3079 2871,3107 2936,3107 2998,3169 2998,3451 3110,3563 3110,3724 CN3.8@3144,3758
GPIO53: CN3.7 U13.72 | length 725.4
  Top Layer w10: U13.72@2892.13,3055.9 2914.9,3055.9 3014,3155 3014,3443 3160,3589 CN3.7@3160,3657
GPIO58: CN3.9 DS1.2 U13.61 | length 2899
  Top Layer w10: DS1.2@1530,3435 1530,3547 1576,3593 1624,3593 1627.5,3589.5 v2(1627.5,3594.5) ; U13.61@3096.9,2755.9 U13.61@3092.13,2755.9 3035,2813.03 3035,3439 3244,3648 CN3.9@3244,3658
  Bottom Layer w10: v2(1627.5,3594.5) 1628,3595 3188,3595 3244,3651 CN3.9@3244,3658
GPIO60: CN3.11 K1.1 R29.2 U13.62 | length 3729.1
  Top Layer w10: K1.1@788.39,2330 791.5,2333.11 R29.2@791.5,2440 v2(791.5,2684.79) ; K1.1@792.18,2329.35 K1.1@792.18,2330 ; U13.62@3092.13,2857.87 U13.62@3092.13,2855.9 3134,2897.78 3134,3399 3344,3609 CN3.11@3344,3658
  Bottom Layer w10: v2(791.5,2684.79) 856.79,2684.79 1099,2927 2229,2927 2340.62,2815.38 3051.6,2815.38 U13.62@3092.13,2855.9
GPIO61: CN3.10 K2.1 R32.2 U13.63 | length 4270.3
  Top Layer w10: K2.1@792.18,1981.24 792.18,2065.96 791.5,2066.64 R32.2@791.5,2090 791.5,2227.5 838,2274 838,2388 820,2406 820,2823.38 v2(839.44,2842.83) ; U13.63@3092.13,2955.9 3051,2997.03 3051,3431 3227,3607 3284,3607 3307,3630 3307,3695 CN3.10@3244,3758
  Bottom Layer w10: v2(839.44,2842.83) 851.83,2842.83 1031,3022 2270,3022 2378,2914 3050.22,2914 U13.63@3092.13,2955.9
GPIOD0: JP6.1 U13.110 | length 2525.8
  Top Layer w8: JP6.1@2437,3657 2432,3657 2363.19,3588.19 2363.19,2717.81 2712,2369 v1(2712,1937)
  Bottom Layer w8: U13.110@2104.73,1968.5 2145.23,1928 2703,1928 v1(2712,1937)
GPIOD1: JP6.2 U13.115 | length 2803.8
  Top Layer w8: JP6.2@2437,3757 2433,3757 2349.19,3673.19 2349.19,2697.81 2684,2363 v1(2684,1833)
  Bottom Layer w10: U13.115@2004.73,1868.5 2045.23,1828 2087.92,1828 ; 2087.94,1827.98 2121.51,1827.98 ; 2121.54,1828 2187.92,1828 ; 2187.94,1827.98 2221.51,1827.98 ; 2221.54,1828 2679,1828 v1(2684,1833) v1@2687,1836
GPIOD5: JP6.4 U13.79 | length 1087.9
  Top Layer w8: JP6.4@2537,3757 2582,3712 2582,3609 2442,3469 2442,3072.25 2442.13,3072.13 2442.13,3029.87 2460.57,3011.43 2642.57,3011.43 2692.13,2961.87 U13.79@2692.13,2955.9
GPIOD6: JP6.3 U13.83 | length 871.7
  Top Layer w8: JP6.3@2537,3657 2537,3588.8 2428,3479.8 2428,3022 2452.57,2997.43 2550.6,2997.43 U13.83@2592.13,2955.9
HOLD: CN1.24 U13.159 | length 889.1
  Top Layer w10: U13.159@3092.13,981.1 3100.9,981.1 3154,928 3216,928 3235,909 3235,812 3333,714 3333,249.44 CN1.24@3344.44,238
HOLDA: JP6.5 U13.82 | length 1469
  Top Layer w8: U13.82@2592.13,2855.9 2542.03,2906 2449,2906 2414,2941 2414,3494 2490,3570 2490,3783 2522,3815 2666,3815 2688,3793 2688,3700 2645,3657 JP6.5@2639,3657 JP6.5@2637,3657
MC: JP5.1 R50.2 U13.17 | length 1305.8
  Top Layer w10: U13.17@3779.53,1868.5 3779.53,1852.47 3813,1819 4130,1819 v1@4164,1785 ; v1(4242,1787) 4242,1320 4281,1281 JP5.1@4285,1281 4285,1292 4324,1331 4483.5,1331 R50.2@4512.5,1302
  Bottom Layer w10: v1(4161,1787) 4229,1787 4233,1783 v1@4235,1785 ; JP5.1@4285,1273 JP5.1@4285,1281
MCLKRA: CN3.30 U13.25 | length 2116.4
  Top Layer w10: v1(4215,2680) 4211,2684 4211,3708 CN3.30@4260,3757
  Bottom Layer w8: U13.25@3779.53,2068.5 3839.02,2128 4173.2,2128 4251,2205.8 4251,2555 4215,2591 v1(4215,2680)
MCLKXA: CN1.23 U13.28 | length 3297.9
  Top Layer w8: CN1.23@3344.44,138 3405.44,77 3672,77 3698,103 3698,165 3719,186 3767,186 3788,165 3788,89 3821,56 4251,56 4287,92 4287,301.79 4218,370.79 4218,923.58 4197,944.58 4197,972 4203,978 4203,2061 v1(4196,2068)
  Bottom Layer w8: U13.28@4079.53,2068.5 4080.03,2068 v1(4196,2068)
MDRA: CN3.27 U13.20 | length 1859.3
  Top Layer w8: U13.20@4079.53,1868.5 4098.5,1868.5 4148,1918 4148,2387 4177,2416 v1(4181,2416)
  Top Layer w10: v1(4152,2679) 4154,2681 4154,3651 CN3.27@4160,3657
  Bottom Layer w8: v1(4152,2679) 4152,2547 4181,2518 v1(4181,2416)
MDXA: CN3.28 U13.22 | length 2139.4
  Top Layer w8: U13.22@3879.53,1968.5 3888.5,1968.5 3940,1917 4105,1917 4133,1945 4133,2405 v1(4146,2418)
  Top Layer w10: v1(4118,2679) 4110,2687 4110,3703 4160,3753 CN3.28@4160,3757
  Bottom Layer w8: v1(4146,2418) 4146,2517
  Bottom Layer w10: v1(4118,2679) 4118,2545 4146,2517
MFSRA: CN3.15 U13.29 | length 1630.5
  Top Layer w10: CN3.15@3548,3657 3548,3658 3544,3658 3544,3589 3669,3464 3669,2222.63 3729.63,2162 3773.02,2162 U13.29@3779.53,2168.5
MFSXA: CN3.29 U13.26 | length 1911.3
  Top Layer w10: v1(4260,2679) CN3.29@4260,3657
  Bottom Layer w8: U13.26@3879.53,2068.5 3879.53,2089.53 3904,2114 4179,2114 4265,2200 4265,2674 v1(4260,2679)
NetC9_1: C9.1 C10.1 D1.2 D2.2 U4.3 U5.3 | length 1070.5
  Top Layer w27.56: 1200,3148 1480,3148 1522.45,3105.55 U5.3@1602.05,3105.55
  Top Layer w39.37: D1.2@775,3271.22 D1.2@775,3260.39 782.78,3268.17 1066.48,3268.17 1074.25,3275.94 C9.1@1090,3275.94 1187.44,3275.94 C10.1@1200,3288.5 1200,3148 ; U4.3@1155.55,3100.55 1200,3145
NetC44_2: C44.2 R30.2 R31.1 U8.3 | length 207.9
  Top Layer w10: R30.2@4431.5,470 C44.2@4431.5,530 ; R31.1@4431.5,590 C44.2@4431.5,530 ; U8.3@4519.39,530 C44.2@4431.5,530
NetC46_2: C46.2 R33.2 R34.1 U8.5 | length 232.9
  Top Layer w10: U8.5@4730.61,480 C46.2@4833.5,480 ; R33.2@4833.5,415 C46.2@4833.5,480 ; R34.1@4833.5,545 C46.2@4833.5,480
NetC48_1: C48.1 JP4.1 R36.2 | length 213
  Top Layer w10: JP4.1@4385,1080 4416.5,1048.5 C48.1@4520,1048.5 R36.2@4585,1048.5
NetC53_1: C53.1 U11.1 | length 86.7
  Top Layer w10: U11.1@4730.79,1862.28 4732.21,1862.28 4738.5,1868.58 C53.1@4738.5,1945
NetC53_2: C53.2 U11.3 | length 250.9
  Top Layer w10: U11.3@4730.79,1762.28 4792.28,1762.28 4810,1780 4810,1932.32 C53.2@4801.5,1940.83
NetC54_1: C54.1 U11.4 | length 113.7
  Top Layer w10: C54.1@4625,1731.5 4667.44,1731.5 4686.66,1712.28 U11.4@4730.79,1712.28
NetC54_2: C54.2 U11.5 | length 108.4
  Top Layer w10: C54.2@4625,1668.5 4631.22,1662.28 U11.5@4730.79,1662.28
NetCN5_1: CN5.1 R30.1 | length 381.6
  Top Layer w10: R30.1@4368.5,470 4368.5,462.5 4371,460 4371,322 4513,180 CN5.1@4544.72,180
NetCN5_3: CN5.3 R33.1 | length 252.4
  Top Layer w10: R33.1@4896.5,415 4896.5,221.93 CN5.3@4938.42,180
NetDS1_1: DS1.1 R16.2 | length 109.9
  Top Layer w19.68: R16.2@1356.5,3445 1361.5,3440 1458.11,3440 1461.1,3437.01 DS1.1@1461.1,3435
NetDS2_1: DS2.1 R17.2 | length 121.4
  Top Layer w19.68: R17.2@1356.5,3375 1356.5,3371.06 1387.56,3340 DS2.1@1461.1,3340
NetF1_1: F1.1 S2.3 | length 229.8
  Top Layer w39.37: S2.3@393.7,3407.09 572.09,3407.09 592.5,3427.5 F1.1@615,3427.5
NetJP2_1: JP2.1 U8.1 U8.2 | length 543.8
  Top Layer w10: JP2.1@4385,980 4334,929 4334,737 4441,630 U8.1@4519.39,630 U8.2@4519.39,580
NetJP3_1: JP3.1 U8.6 U8.7 | length 631.2
  Top Layer w10: JP3.1@4385,880 4385,720 4442,663 4601,663 4627,637 4627,607 4654,580 U8.7@4730.61,580 U8.6@4730.61,530
NetLD1_1: LD1.1 R21.1 | length 87.2
  Top Layer w11.81: R21.1@4341.5,1910 4415.12,1910 LD1.1@4424.68,1919.57
NetLD2_1: LD2.1 R24.1 | length 83.8
  Top Layer w11.81: R24.1@4341.5,1750 4423.1,1750 LD2.1@4424.68,1751.59
NetLD3_1: LD3.1 R25.1 | length 83.8
  Top Layer w11.81: R25.1@4341.5,1585 4423.29,1585 LD3.1@4424.68,1583.61
NetLD4_1: LD4.1 R27.1 | length 83.4
  Top Layer w11.81: R27.1@4341.5,1415 4424.05,1415 LD4.1@4424.68,1415.63
NetQ1_D: Q1.D U7.2 | length 146.7
  Top Layer w19.68: U7.2@1384.23,1285 1384.65,1284.59 1530.18,1284.59 Q1.D@1530.59,1284.17
NetQ1_G: Q1.G R26.1 | length 81.3
  Top Layer w10: Q1.G@1625.08,1246.77 R26.1@1706.42,1246.77
NetR3_2: R3.2 SW1.1 | length 480.7
  Top Layer w10: SW1.1@1770,70.16 1813.44,113.6 1813.44,494.06 R3.2@1786,521.5
NetR5_2: R5.2 SW1.2 | length 474.6
  Top Layer w10: SW1.2@1870,70.16 1913.44,113.6 1913.44,502.06 R5.2@1896,519.5
NetR7_2: R7.2 SW1.3 | length 469.6
  Top Layer w10: SW1.3@1970,70.16 2013.44,113.6 2013.44,514.06 R7.2@2008,519.5
NetR9_2: R9.2 SW1.4 | length 470.1
  Top Layer w10: SW1.4@2070,70.16 2120,120.16 R9.2@2120,519.5
NetR23_2: R23.2 U7.1 | length 198.1
  Top Layer w19.68: R23.2@1015,1347.09 1125.3,1347.09 U7.1@1187.38,1285
NetR36_1: R36.1 R38.2 | length 1019.7
  Top Layer w10: R36.1@4585,1111.5 v1(4633,1111.5) v1@4635.5,1111.5
  Bottom Layer w10: v1@4632,1108 4632,698 4675,655 R38.2@5169.41,655 R38.2@5173.35,655